# Altium PCB BOB_PAC5527.PcbDoc (part 2 of 3)
Units mm, origin at the board's own origin, x right, y up, seen from the top; angles counter-clockwise.
Board outline 40 x 40 mm, 2 copper layers (Top Layer, Bottom Layer), stack 1.448 mm thick; 84 components, 61 nets, 272 pads, 317 vias.
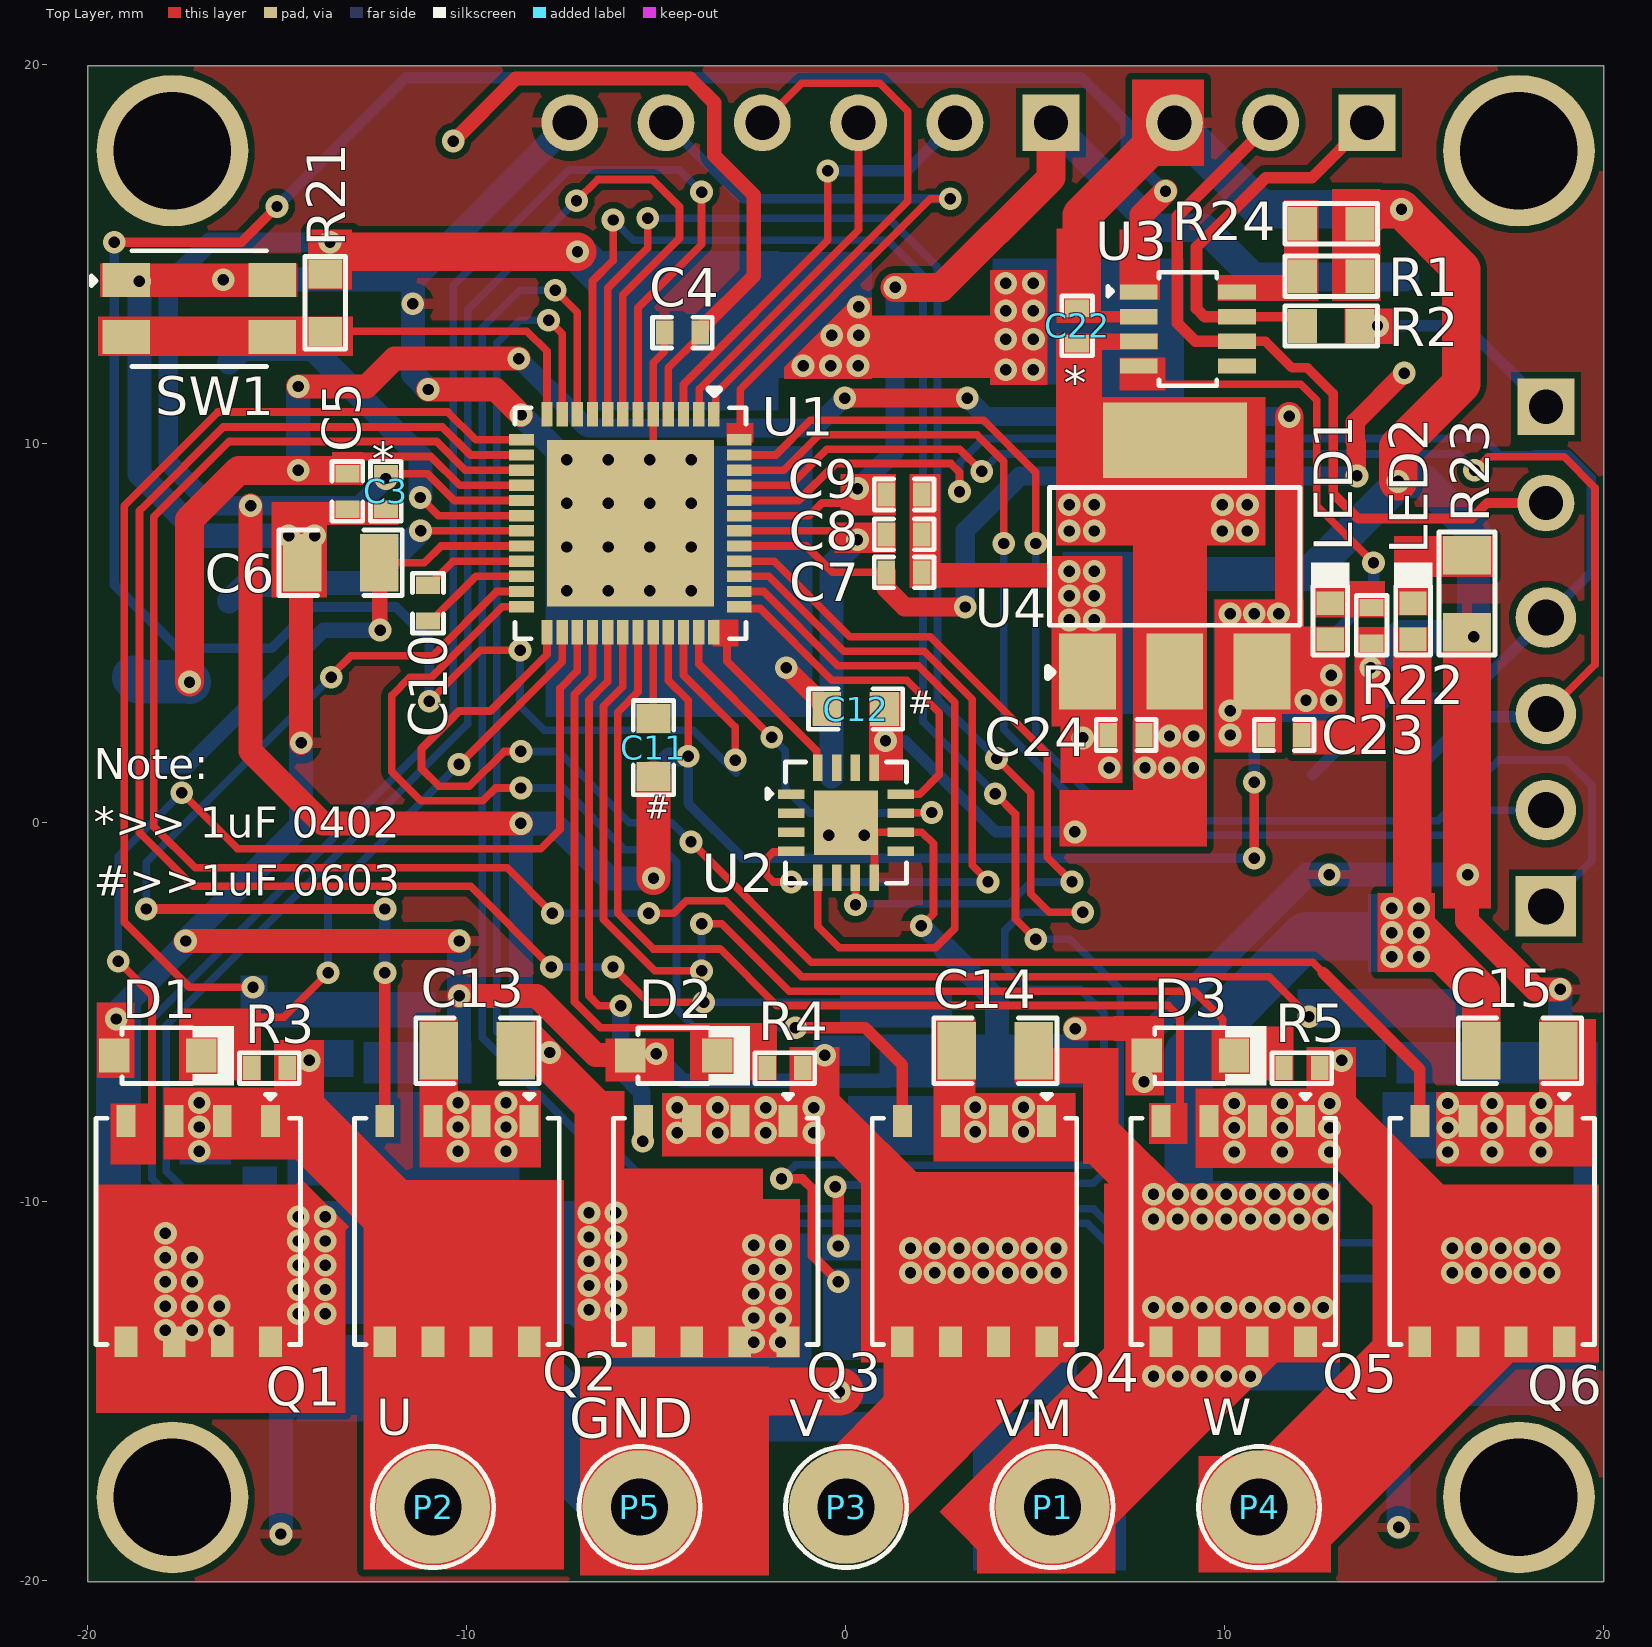
[diagram p0: Top Layer view]

## Part data (continued)
R22: library part ERJ-2GEJ102X, "RES SMD 1K OHM 5% 1/10W 0402", Case/Package=0402, Manufacturer=Panasonic, Max Operating Temperature=155°C, Min Operating Temperature=-55°C, Package Height=0.35mm, Package Length=1mm, Package Shape=Rectangular, Package Style=SMTMeter, Package Width=0.5mm, Power=100mW, Rated Temperature=70°C, Resistor Type="FIXED RESISTOR", Supplier Part Number 1=7324867, Temperature Coefficient=200ppm/°C, Tolerance=5%, Working Voltage=50V, Category="Chip SMD Resistors", ComponentLink1Description=https://datasheet.ciiva.com:443/pdfs/VipMasterIC/IC/PANA/PANA-S-A0009891627/PANA-S-A0009891627-1.pdf?src-supplier=IHS+Markit, ComponentLink1URL=https://datasheet.ciiva.com:443/pdfs/VipMasterIC/IC/PANA/PANA-S-A0009891627/PANA-S-A0009891627-1.pdf?src-supplier=IHS+Markit, ComponentLink2Description=https://datasheet.ciiva.com/34303/1986781-34303542.pdf?src-supplier=Jameco, ComponentLink2URL=https://datasheet.ciiva.com/34303/1986781-34303542.pdf?src-supplier=Jameco, ComponentLink3Description=https://datasheet.ciiva.com/11821/0900766b80f806dd-11821202.pdf?src-supplier=Rs, ComponentLink3URL=https://datasheet.ciiva.com/11821/0900766b80f806dd-11821202.pdf?src-supplier=Rs, ComponentLink4Description=https://datasheet.ciiva.com/43460/1500035-43460379.pdf?src-supplier=Farnell, ComponentLink4URL=https://datasheet.ciiva.com/43460/1500035-43460379.pdf?src-supplier=Farnell, ComponentLink5Description=https://datasheet.ciiva.com/46386/1500035-46386458.pdf?src-supplier=Element14, ComponentLink5URL=https://datasheet.ciiva.com/46386/1500035-46386458.pdf?src-supplier=Element14, ComponentLink6Description=https://datasheet.ciiva.com/22783/1500035-22783817.pdf?src-supplier=Farnell, ComponentLink6URL=https://datasheet.ciiva.com/22783/1500035-22783817.pdf?src-supplier=Farnell, ComponentLink7Description=https://datasheet.ciiva.com/46371/1500035-46371935.pdf?src-supplier=Element14, ComponentLink7URL=https://datasheet.ciiva.com/46371/1500035-46371935.pdf?src-supplier=Element14, ComponentLink8Description=https://datasheet.ciiva.com/16762/70260739-16762170.pdf?src-supplier=Allied+Electronics, ComponentLink8URL=https://datasheet.ciiva.com/16762/70260739-16762170.pdf?src-supplier=Allied+Electronics, ComponentLink9Description=https://datasheet.ciiva.com/16199/aoa0000ce1-16199541.pdf?src-supplier=Future+Electronics, ComponentLink9URL=https://datasheet.ciiva.com/16199/aoa0000ce1-16199541.pdf?src-supplier=Future+Electronics, ComponentLink10Description=https://datasheet.ciiva.com/48531/aoa0000ce1-48531081.pdf?src-supplier=Avnet, ComponentLink10URL=https://datasheet.ciiva.com/48531/aoa0000ce1-48531081.pdf?src-supplier=Avnet, ComponentLink11Description=https://datasheet.ciiva.com/30219/4aoa0000ce1-30219159.pdf?src-supplier=Onlinecomponents.com, ComponentLink11URL=https://datasheet.ciiva.com/30219/4aoa0000ce1-30219159.pdf?src-supplier=Onlinecomponents.com, Construction=Rectangular, Item Type=Resistor, JESD-609 Code=e3, Manufacturer Part Number=ERJ-2GEJ102X, Mounting Technology="Surface Mount", Packaging="Tape and Reel", Pins=2, Pricing 1="10000=0.00400, 30000=0.00300 (GBP)", Reach SVHC Compliant=Yes, Reference Standard=AEC-Q200, RoHS=Yes, RoHS Compliant=Yes, Stock 1=600000, Supplier 1=Rs, Technology="METAL GLAZE/THICK FILM", Terminal Finish=Nickel, Termination=Wraparound
R23: library part CRCW08054K70FKEAHP, "Res Thick Film 0805 4.7K Ohm 1% 0.5W ±100ppm/°C Molded SMD SMD Paper T/R", Case Code (Imperial)=0805, Case Code (Metric)=2012, LCSC Part Number=C313926, Manufacturer=Vishay, Max Operating Temperature=155°C, Max Power Dissipation=500mW, Min Operating Temperature=-55°C, Package Quantity=5000, Power Rating=330mW, Ratings=AEC-Q200, Resistance=4.7kR, Resistance Tolerance=1%, Resistor Type="Thick Film", Supplier Part Number 1=8123574P, Temperature Coefficient=100ppm/°C, Voltage Rating=150V, Case/Package=0805, Category="Chip SMD Resistors", ComponentLink1Description=https://datasheet.ciiva.com/8079/424479-8079653.pdf?src-supplier=Element14, ComponentLink1URL=https://datasheet.ciiva.com/8079/424479-8079653.pdf?src-supplier=Element14, ComponentLink2Description=https://datasheet.ciiva.com/9072/crcwhpe3-9072073.pdf?src-supplier=Avnet, ComponentLink2URL=https://datasheet.ciiva.com/9072/crcwhpe3-9072073.pdf?src-supplier=Avnet, Construction=Rectangular, Contact Plating=Tin, Depth=1.25mm, Features="Automotive AEC-Q200", Height=0.5mm, Item Type=Resistor, Lead Free="Lead Free", Length=2mm, Manufacturer Part Number=CRCW08054K70FKEAHP, Military Standard=Not, Mount="Surface Mount", Number of Terminations=2, Packaging="Tape and Reel", Pricing 1="100=0.15700, 250=0.14600, 500=0.13600, 1000=0.12500 (GBP)", Radiation Hardening=No, RoHS=Yes, RoHS Compliant=Yes, Series=CRCW-HP, Stock 1=8150, Supplier 1=RSComponents, Technology="THICK FILM", Termination=SMD/SMT, Tolerance=1%, Voltage Rating (DC)=150V, Weight=0.000194oz, Width=1.2mm
R24: library part RC0603JR-070RL, "RES 0 OHM JUMPER 1/10W 0603", Case Code (Imperial)=0603, Case Code (Metric)=1608, Manufacturer=Yageo, Max Operating Temperature=155°C, Max Power Dissipation=100mW, Min Operating Temperature=-55°C, Package Quantity=5000, Resistance=0mR, Resistance Tolerance=5%, Resistor Type="Thick Film", Supplier Part Number 1=311-0.0GRCT-ND, Temperature Coefficient=200ppm/°C, Tolerance=1%, Voltage Rating=50V, Case/Package=0603, Category="Chip SMD Resistors", Construction=Rectangular, Contact Plating=Tin,Matte, Depth=0.8mm, Features="Moisture Resistant", Height=0.45mm, Lead Free="Lead Free", Length=1.6mm, Manufacturer Part Number=RC0603JR-070RL, Military Standard=Not, Number of Pins=2, Number of Terminations=2, Packaging="Tape and Reel", Power Rating=100mW, Pricing 1="1=0.10000, 10=0.01700, 25=0.01240, 50=0.00960, 100=0.00700, 250=0.00536, 500=0.00430, 1000=0.00316 (USD)", Radiation Hardening=No, Reach SVHC Compliant="No SVHC", RoHS=Yes, RoHS Compliant=Yes, Series=RC, Size Code=0603, Stock 1=18081776, Supplier 1=Digi-Key, Technology="THICK FILM", Termination=SMD/SMT, Voltage Rating (DC)=50V, Width=0.8mm
SW1: "3mm 2mm Round Button 50mA Top3.65mm SPST 12V SMD Tactile Switches", LCSC Part Number=C318893, Manufacturer=XKB, ComponentLink1Description=LCSC, ComponentLink1URL=https://lcsc.com/product-detail/Tactile-Switches_XKB-Connectivity-TS-1185EC-C-D-B_C318893.html, Manufacturer Part Number=TS-1185EC-C-D-B
U1: "PAC5527 48V BLDC Motor Controller and Driver Evaluation Board", Manufacturer=Qorvo, Category=Uncategorized, Item Type=IC, Manufacturer Part Number=PAC5527QMST, Pricing 1="100=4.78000 (USD)", Pricing 2="1=156.25000, 10=156.25000, 50=156.25000, 100=156.25000, 1000=156.25000, 10000=156.25000 (USD)", RoHS=No, Stock 2=1, Supplier 1=Avnet, Supplier 2=Mouser, Supplier Part Number 1=PAC5527QMST, Supplier Part Number 2=107-PAC5527EVK1
U2: "SENSOR ANGLE SMD", Case/Package=QFN, Frequency=26MHz, Frequency Stability=10ppm, Manufacturer="Monolithic Power Systems", Max Operating Temperature=85°C, Max Supply Current=7mA, Min Operating Temperature=-40°C, ComponentLink1Description=https://www.monolithicpower.com/pub/media/document/m/a/ma702_r1.0.pdf?src-supplier=Digi-Key, ComponentLink1URL=https://www.monolithicpower.com/pub/media/document/m/a/ma702_r1.0.pdf?src-supplier=Digi-Key, Item Type=IC, Manufacturer Part Number=MA702GQ-Z, Mount="Surface Mount", Packaging="Tape and Reel", Pricing 1="5000=3.15000, 10000=2.97500, 20000=2.80000, 30000=2.62500, 40000=2.45000 (USD)", RoHS=Yes, RoHS Compliant=Yes, Sensing Method="Hall Effect", Stock 1=110000, Supplier 1=Avnet, Supplier Part Number 1=MA702GQ-Z, Termination=SMD/SMT
U3: "IC TXRX CAN 3.3V SOT23-8", LCSC Part Number=C112005, Manufacturer=Maxim, Max Operating Temperature=85°C, Max Supply Current=70mA, Max Supply Voltage=3.465V, Min Operating Temperature=-40°C, Min Supply Voltage=3.135V, Operating Supply Current=35mA, Operating Supply Voltage=3.3V, Package=SOT-23-8, Package Quantity=1, Supplier Part Number 1=700-MAX3051EKAT, Category="Interface ICs", ComponentLink1Description=https://datasheet.ciiva.com/12072/max3051-74908-12072588.pdf?src-supplier=Mouser, ComponentLink1URL=https://datasheet.ciiva.com/12072/max3051-74908-12072588.pdf?src-supplier=Mouser, ComponentLink2Description=https://datasheet.ciiva.com/1711/max3051-1711846.pdf?src-supplier=Digi-Key, ComponentLink2URL=https://datasheet.ciiva.com/1711/max3051-1711846.pdf?src-supplier=Digi-Key, ComponentLink3Description=https://datasheet.ciiva.com/1711/max3051-1711847.pdf?src-supplier=Digi-Key, ComponentLink3URL=https://datasheet.ciiva.com/1711/max3051-1711847.pdf?src-supplier=Digi-Key, ComponentLink4Description=https://datasheet.ciiva.com/1711/max3051-1711845.pdf?src-supplier=Digi-Key, ComponentLink4URL=https://datasheet.ciiva.com/1711/max3051-1711845.pdf?src-supplier=Digi-Key, Contact Plating=Tin,Matte, Data Rate=1Mbps, Height=1.25mm, Interface=CAN, Item Type=IC, Length=2.9mm, Manufacturer Part Number=MAX3051EKA+T, Mount="Surface Mount", Number of Pins=8, Number of Receive Buffers=1, Number of Transceivers=1, Number of Transmit Buffers=1, Packaging="Tape and Reel", Pricing 1="1=3.87000, 10=3.47000, 50=3.28000, 100=2.85000, 1000=2.19000, 10000=2.11000 (USD)", Radiation Hardening=No, RoHS=Yes, RoHS Compliant=Yes, Series=-, Stock 1=31750, Supplier 1=Mouser, Weight=0.01787oz, Width=1.625mm
U4: "15V 1.3V @ 800mA Fixed 3.3V SOT-223 Linear Voltage Regulators (LDO) ROHS", LCSC Part Number=C92102, Manufacturer="Diodes Incorporated", Package=SOT-223, Item Type=IC, Manufacturer Part Number=AZ1117CH-3.3TRG1

## Free pads (board coordinates)
  round 4 hole 3.1: MH(-17.771,-17.805) MH(-17.771,17.729) MH(17.757,-17.805) MH(17.757,17.729)

## Via types
v1: diameter 0.6, hole 0.3, Top Layer to Bottom Layer, 182 vias
v2: diameter 0.6, hole 0.3, Top Layer to Bottom Layer, tented both sides, 135 vias

## Nets (pads, with @x,y where several pads share a name; then routed paths per layer and width w, separated by ;. In a path a pad name is that pad's centre, name@x,y a point inside that pad or via, vN(x,y) a via of type N, cw(c..) or ccw(c..) an arc to the next point about the centre after c; other vN are vias at no path point)
3V3_LDO: C12.1 C22.1 C24.1 U2.13 U3.3 U4.2 U4.4 | length 9.1
  Top Layer w0.203: U2.13@0.75,1.45 0.75,2.731 C12.1@1.016,2.997 ; C22.1@6.123,12.725 C22.1@6.149,12.7
  Top Layer w0.305: v2(6.04,-0.245) 7.477,-0.245 7.493,-0.229
  Bottom Layer w0.305: v2(1.041,2.159) 1.549,2.159 3.953,-0.245 v2(6.04,-0.245)
  other v1: 7.89,1.448 8.53,1.448 9.169,1.448 8.534,2.286 9.174,2.286 5.893,7.696 6.553,7.696 9.931,7.696 10.592,7.696 5.893,8.387 6.553,8.387 9.931,8.387 10.592,8.387
5VSYS: C5.1 C23.1 LED1.1 P15.1 U1.16 U4.3 | length 50.3
  Top Layer w0.203: C5.1@-13.168,9.385 C5.1@-13.168,9.411 ; -12.758,9.644 -12.742,9.66 -10.955,9.66 -10.195,8.899 U1.16@-8.563,8.899
  Top Layer w0.508: v2(-0.036,11.201) v2(3.2,11.201)
  Top Layer w0.635: v2(-14.453,11.506) -12.649,11.506 -11.913,12.243 v2(-8.636,12.243)
  Top Layer w0.762: v2(-17.323,3.708) -17.323,7.991 -16.017,9.296 v2(-14.453,9.296) -13.231,9.296 C5.1@-13.155,9.373 ; v1@11.697,5.537 v2(11.697,10.719)
  Bottom Layer w0.406: P15.1@-18.827,3.861 P15.1@-18.801,3.835
  Bottom Layer w0.508: v2(-8.636,12.243) -7.112,10.719 -7.112,10.692 -6.859,10.439 -6.833,10.439 -6.807,10.414 -0.844,10.414 -0.061,11.197 v2@-0.036,11.197 ; v2(3.2,11.201) 3.683,10.719 v2(11.697,10.719)
  Bottom Layer w0.635: v2(-14.453,9.296) v2(-14.453,11.506)
  Bottom Layer w1.143: P15.1@-18.801,3.835 -18.683,3.717 -17.331,3.717 v2(-17.323,3.708)
  other v1: 10.135,2.311 10.135,2.951 12.138,3.226 12.802,3.226 12.802,3.89 10.135,5.512 10.774,5.512 11.414,5.512
AIO0: C16.1 R18.2 U1.6 | length 45.7
  Top Layer w0.203: U1.6@-5.488,10.774 -5.488,13.586 -3.81,15.263 v2(-3.81,16.637)
  Bottom Layer w0.203: -17.712,-9.99 -18.313,-9.389 -18.313,-5.188 -10.363,2.762 -10.363,14.173 -7.315,17.221 -4.394,17.221 v2(-3.81,16.637)
  Bottom Layer w0.254: -17.712,-9.99 -16.763,-10.939 -16.749,-10.939 -15.545,-12.143 -15.545,-12.446
AIO1: C16.2 R6.2 U1.7 | length 42.8
  Top Layer w0.203: v2(-7.112,16.408) -6.553,16.967 -5.105,16.967 -4.392,16.254 -4.392,15.418 -5.888,13.922 U1.7@-5.888,10.774
  Bottom Layer w0.203: -15.467,-10.808 -15.467,-10.365 -15.824,-10.008 -17.12,-10.008 -17.932,-9.195 -17.932,-5.346 -9.982,2.604 -9.982,13.538 v2(-7.112,16.408)
AIO2: C17.1 R19.2 U1.8 | length 55.4
  Top Layer w0.203: U1.8@-6.288,10.774 -6.288,14.107 -5.23,15.164 v2(-5.23,15.946) ; v2(3.973,1.691) 4.877,0.787 4.877,-1.88 5.359,-2.362 v2(6.248,-2.362)
  Top Layer w0.254: v2(-1.702,-9.398) -1.143,-9.398 -0.891,-9.65 -0.891,-9.857 -0.889,-9.858 -0.889,-11.425 v2(-0.203,-12.111)
  Bottom Layer w0.203: v2(-5.23,15.946) 1.122,15.946 2.415,14.654 2.415,3.25 v2(3.973,1.691) ; v2(-1.702,-9.398) -1.33,-9.027 -0.081,-9.027 -0.065,-9.042 6.452,-9.042 6.807,-8.687 6.807,-5.029 6.172,-4.394 4.801,-4.394 4.191,-3.785 4.191,-2.845 4.674,-2.362 v2(6.248,-2.362) ; C17.1@0.383,-12.027 C17.1@0.396,-12.014
AIO3: C17.2 R7.2 U1.9 | length 49.5
  Top Layer w0.203: U1.9@-6.688,10.774 -6.688,14.291 -6.145,14.834 v2(-6.145,15.9) ; v2(3.937,0.762) 4.47,0.229 4.47,-2.54 v2(5.004,-3.073)
  Top Layer w0.305: v2(-0.286,-9.606) -0.286,-9.686 -0.203,-9.769 v2(-0.203,-11.171)
  Bottom Layer w0.203: v2(-6.145,15.9) -5.611,15.367 1.094,15.367 2.034,14.428 2.034,2.665 v2(3.937,0.762) ; v2(-0.286,-9.606) -0.239,-9.559 0.336,-9.559 0.383,-9.512 6.521,-9.512 7.239,-8.794 7.239,-4.394 5.918,-3.073 v2(5.004,-3.073)
  Bottom Layer w0.508: v2@-0.33,-11.146 v2@-0.305,-11.146
AIO4: C18.1 R20.2 U1.10 | length 52.9
  Top Layer w0.203: v2(-7.669,14.046) -7.088,13.465 U1.10@-7.088,10.774
  Bottom Layer w0.203: v2(-7.669,14.046) -8.611,14.046 -9.596,13.06 -9.596,-5.669 -4.699,-10.566 6.37,-10.566 7.83,-12.027 C18.1@14.582,-12.027 ; 14.238,-13.931 14.581,-13.588 14.581,-12.967 ; C18.1@14.327,-12.193 14.581,-12.447
AIO5: C18.2 R8.2 U1.11 | length 48.8
  Top Layer w0.203: v2(-7.847,13.259) -7.488,12.9 U1.11@-7.488,10.774
  Bottom Layer w0.203: v2(-7.847,13.259) -8.611,13.259 -9.215,12.654 -9.215,-5.511 -4.541,-10.185 6.528,-10.185 7.429,-11.087 14.428,-11.087 C18.2@14.582,-11.087 ; C18.2@14.428,-11.023 14.582,-10.869 14.582,-10.795
AIO10: C13.1 Q2.1 Q2.2 Q2.3 R6.1 R13.1
  other v1: -10.236,-8.671 -8.971,-8.671 -10.236,-8.031 -8.971,-8.031 -10.236,-7.391 -8.971,-7.391
AIO32: C14.1 Q4.1 Q4.2 Q4.3 R7.1 R14.1
  other v1: 3.414,-8.153 4.684,-8.153 3.414,-7.514 4.684,-7.514
AIO54: C15.1 Q6.1 Q6.2 Q6.3 R8.1 R15.1
  other v1: 15.875,-8.692 17.043,-8.692 18.339,-8.692 15.875,-8.052 17.043,-8.052 18.339,-8.052 15.875,-7.412 17.043,-7.412 18.339,-7.412
CANH: J2.1 R2.1 U3.7 | length 10.5
  Top Layer w0.254: U3.7@10.314,13.35 11.798,13.35 R2.1@12.042,13.106
  Top Layer w0.305: U3.7@10.314,13.35 9.461,13.35 9.248,13.564 9.248,15.189 11.076,17.018 12.296,17.018 J2.1@13.743,18.466
CANL: J2.2 P17.2 U3.6 | length 19.9
  Top Layer w0.254: U3.6@10.314,12.7 11.074,12.7 11.773,12.002 12.175,12.002 12.852,11.325 12.852,8.687 13.513,8.026 16.51,8.026 16.916,8.433 P17.2@18.468,8.433
  Top Layer w0.305: U3.6@10.314,12.7 9.222,12.7 8.74,13.183 8.74,16.002 J2.2@11.203,18.466
CPH: C10.2 U1.22 | length 2.9
  Top Layer w0.203: C10.2@-10.94,5.323 -9.763,6.499 U1.22@-8.563,6.499
CPL: C10.1 U1.21 | length 2.8
  Top Layer w0.203: C10.1@-11.043,6.134 -11.043,6.223 -10.367,6.899 U1.21@-8.563,6.899
DRSU: D1.1 R3.2 U1.26 | length 14.8
  Top Layer w0.203: -16.942,-5.207 -16.521,-5.628 -16.521,-5.842 ; -15.67,-5.131 -14.837,-5.131 v2(-13.665,-3.959) ; v2(-10.211,1.537) -10.198,1.537 -7.488,4.247 U1.26@-7.488,5.024
  Bottom Layer w0.203: v2(-13.665,-3.959) -13.665,-1.918 v2(-10.211,1.537)
DRSV: D2.1 R4.2 U1.28 | length 14.3
  Top Layer w0.203: U1.28@-6.688,5.024 -6.688,3.865 -7.163,3.39 -7.163,-4.726 -6.479,-5.41 -4.087,-5.41 -3.395,-6.103 D2.1@-3.395,-6.147
DRSW: D3.1 R5.2 U1.30 | length 28.1
  Top Layer w0.203: U1.30@-5.888,5.024 -5.888,3.587 -6.401,3.074 -6.401,-2.552 -5.041,-3.912 v2(-3.81,-3.912) ; v2(-3.81,-2.667) -3.277,-2.667 -1.499,-4.445 6.788,-4.445 9.195,-4.445 9.94,-5.19 9.94,-5.848 D3.1@10.238,-6.147
  Bottom Layer w0.203: v2(-3.81,-3.912) v2(-3.81,-2.667)